# Altium PCB Motor Connection V1.PcbDoc
Units mm, origin at the board's own origin, x right, y up, seen from the top; angles counter-clockwise.
Board outline 33.5 x 13.5 mm, 4 copper layers (Top, Route2, Route15, Bottom), stack 1.78 mm thick; 10 components, 20 nets, 68 pads, 34 vias.
Unrouted connection lines stored in the file: 18.
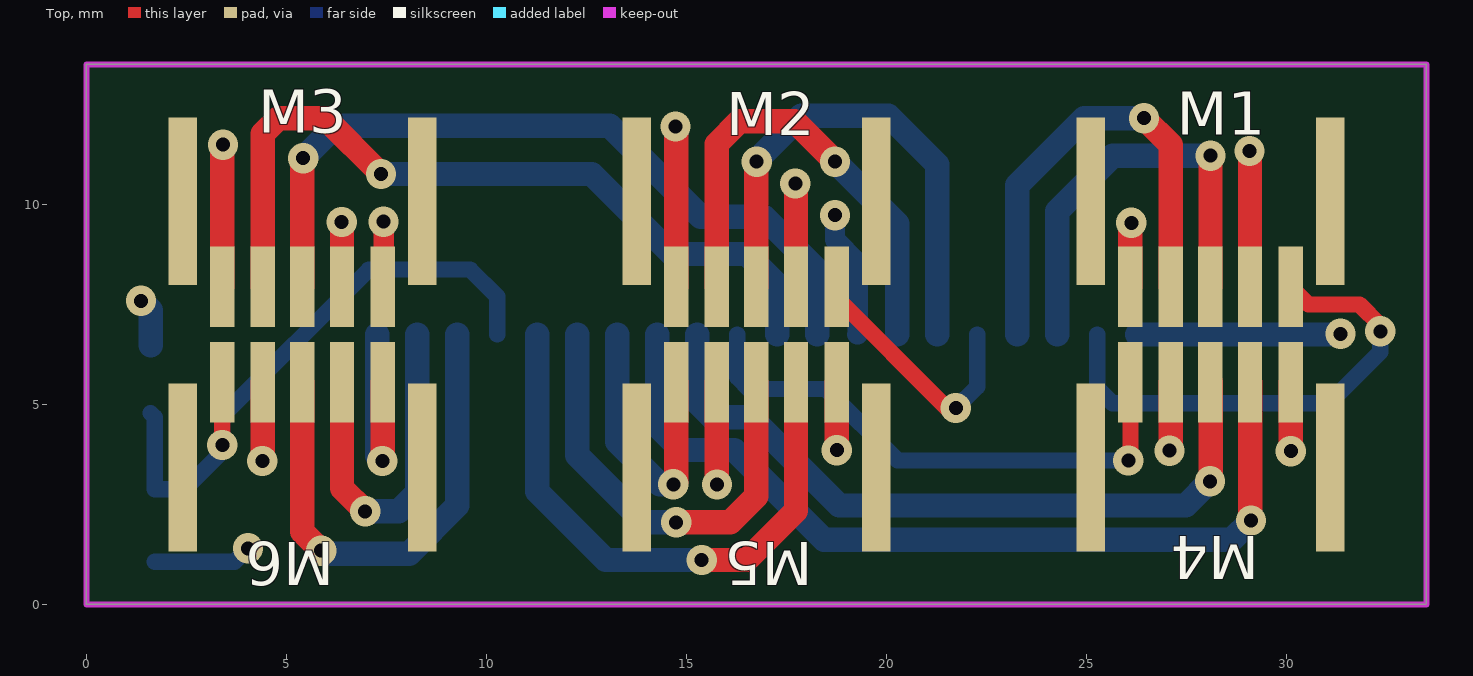
[diagram p0: Top view]
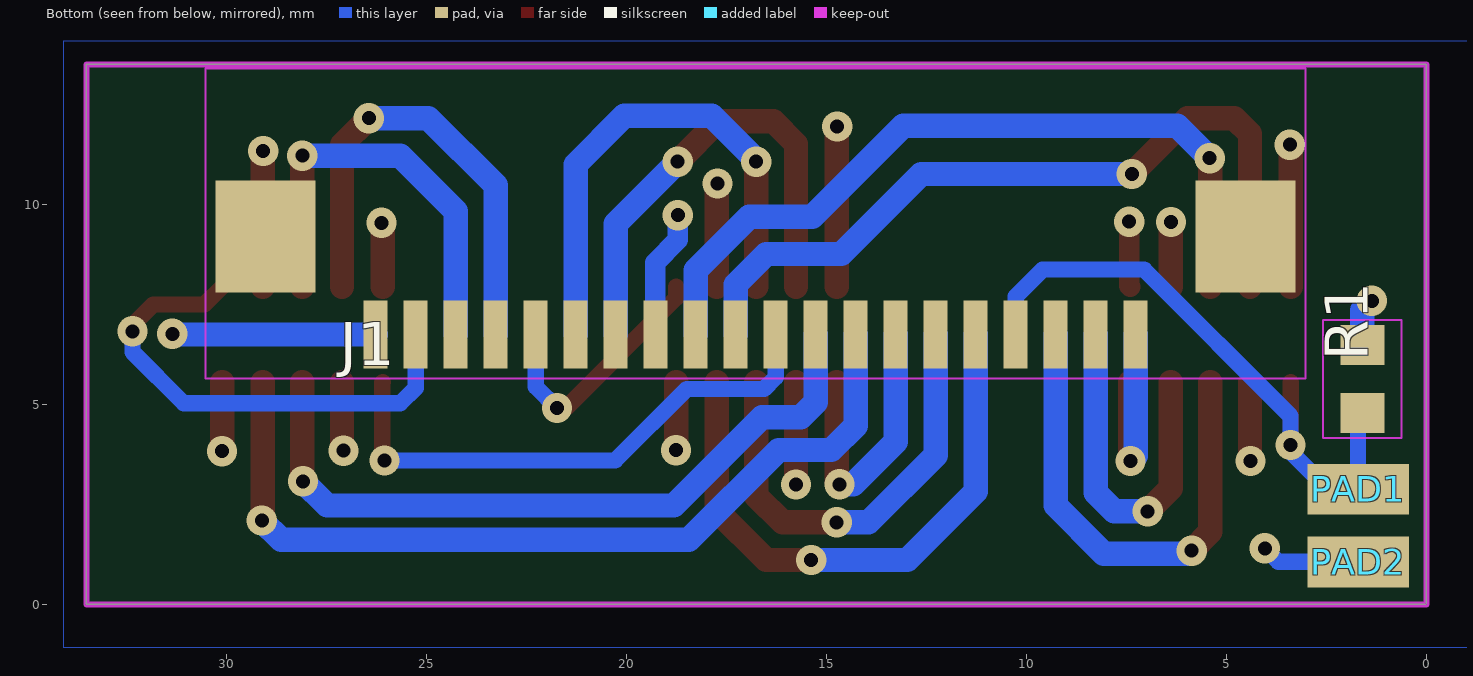
[diagram p1: Bottom view, seen from below]
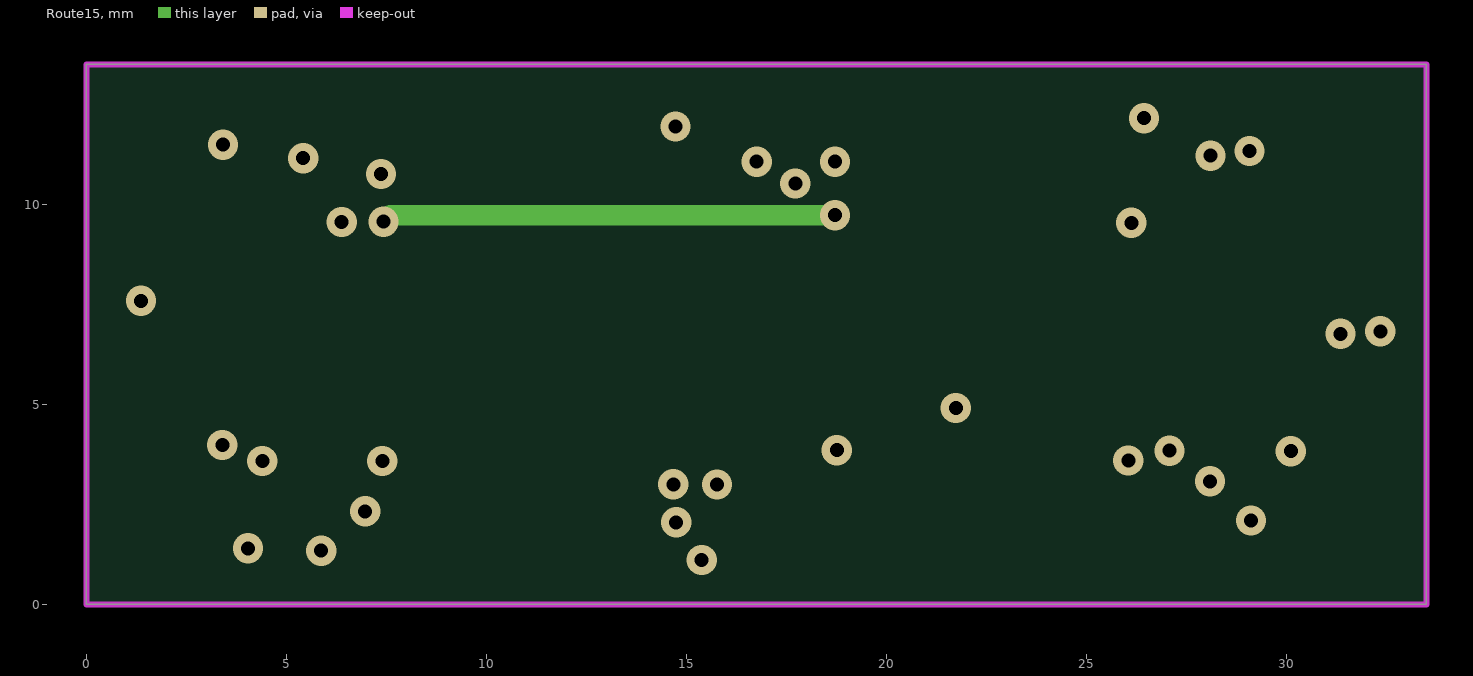
[diagram p2: Route15]

## Layer stack, top to bottom
Top Solder: solder mask 0.0102, Solder Resist, Dk 3.5
Top: signal copper 0.035
Dielectric 1: dielectric 0.32, FR-4, Dk 4.8
Route2: signal copper 0.035
Dielectric 3: core 1, FR-4, Dk 4.8
Route15: signal copper 0.035
Dielectric2: dielectric 0.32, FR-4, Dk 4.8
Bottom: signal copper 0.035
Bottom Solder: solder mask 0.0102, Solder Resist, Dk 3.5

## Board outline
0,13.5 0,0 33.5,0 33.5,13.5

## Design rules (kind name [scope] priority, off if disabled: settings)
BoardOutlineClearance mdCopperDimension [All] p1: gap=0.254 ignorepadtopadclearanceinfootprint=FALSE except(0: Arc-SplitContinuation Track-SplitContinuation SMDPad-SplitContinuation THPad-SplitContinuation Via-SplitContinuation Fill-SplitContinuation Poly-SplitContinuation Region-SplitContinuation Text-SplitContinuation; 0.3: Poly-OutlineEdge Poly-CavityEdge Poly-CutoutEdge Poly-SplitBarrior)
Clearance "Clearance (Same Net)" [All] p1: gap=0.152 ignorepadtopadclearanceinfootprint=FALSE
Clearance [All] p2: gap=0.152 ignorepadtopadclearanceinfootprint=FALSE
HoleSize [All] p1: absolutevalues=TRUE maxlimit=2540 minlimit=0.35 maxpercent=80.000 minpercent=20.000
HoleToHoleClearance mdDrill [All] p1: gap=0.152 allowstackedmicrovias=TRUE
MinimumSolderMaskSliver [All] p1 off: minsoldermaskwidth=0.254
PasteMaskExpansion mlMinCreamFrame [All] p1: expansion=0
PolygonConnect PolygonConnect_For_PolygonThermal_ON_Width59100_Gap100000 [InPolygonClass('PolygonThermal_ON_Width59100_Gap100000') vs Not IsVia] p1: connectstyle=Relief reliefconductorwidth=0.15 reliefentries=4 polygonreliefangle="90 Angle" airgapwidth=0.254
PolygonConnect ThermalVias [IsVia] p2: connectstyle=Direct reliefconductorwidth=0.254 reliefentries=4 polygonreliefangle="90 Angle" airgapwidth=0.254
PolygonConnect [All] p3: connectstyle=Relief reliefconductorwidth=0.254 reliefentries=4 polygonreliefangle="90 Angle" airgapwidth=0.254
RoutingVias [All] p1: holewidth=0.35 width=0.756 viastyle="Through Hole" minholewidth=0.35 minwidth=0.756 maxholewidth=2.54 maxwidth=2.54
SolderMaskExpansion mlMinStopFrame [All] p1: expansion=0.102 istentingtop=FALSE
Width [All] p1: maxlimit=0.254 minlimit=0.152 preferedwidth=0.152
26 further rules are at their usual default settings.

## Classes and differential pairs
polygon class PolygonThermal_ON_Width59100_Gap100000: Polygon_1_Net_GND Polygon_1_Net_VCC Polygon_2_Net_GND Polygon_3_Net_GND

## Components (designator, comment, footprint, x,y, rotation, side; value= is the part's Value field where it differs from the comment)
J1 "" GCT_FFC3B07-20-T 16.77,9.197 r0 bottom
M1 "" FCI_SFW5R-1STE1LF 28.1,5.2 r0 top
M2 "" FCI_SFW5R-1STE1LF 16.75,5.2 r0 top
M3 "" FCI_SFW5R-1STE1LF 5.4,5.2 r0 top
M4 "" FCI_SFW5R-1STE1LF 28.1,8.3 r180 top
M5 "" FCI_SFW5R-1STE1LF 16.75,8.3 r180 top
M6 "" FCI_SFW5R-1STE1LF 5.4,8.3 r180 top
PAD1 "" SMD1,27-2,54 1.708,2.88 r270 bottom
PAD2 "" SMD1,27-2,54 1.709,1.064 r270 bottom
R1 "" R0603 1.604,5.633 r90 bottom

## Footprints (in the part's own frame and the unit in brackets; to place one, negate y for a bottom-side part, rotate by r counter-clockwise, add the part's x,y. Pads: shape width x height; smd on the part's side, far side on the other; paste and mask are expansions set on the pad)
FCI_SFW5R-1STE1LF [mil] "FCI_SFW5R-1STE1LF"
  rect 24x79 smd: 1(79,108) 2(39,108) 3(0,108) 4(-39,108) 5(-79,108)
  rect 28x165 smd: 6(-118,192) 7(118,192)
  body extent -215,55 215,329, height 150
GCT_FFC3B07-20-T [mm] "GCT_FFC3B07-20-T"
  rect 0.6x1.7 smd: 1(9.5,2.45) 2(8.5,2.45) 3(7.5,2.45) 4(6.5,2.45) 5(5.5,2.45) 6(4.5,2.45) 7(3.5,2.45) 8(2.5,2.45) 9(1.5,2.45) 10(0.5,2.45) 11(-0.5,2.45) 12(-1.5,2.45) 13(-2.5,2.45) 14(-3.5,2.45) 15(-4.5,2.45) 16(-5.5,2.45) 17(-6.5,2.45) 18(-7.5,2.45) 19(-8.5,2.45) 20(-9.5,2.45)
  rect 2.5x2.8 smd: S1(12.25,0) S2(-12.25,0)
  Top keep-out lines w0.05: -13.75,3.55 13.75,3.55 13.75,-4.2 -13.75,-4.2 -13.75,3.55
  body extent -13.78,-4.23 13.78,3.58, height 3.81
R0603 [mm] "R0603"
  rect 1x1.1 smd: 1(-0.85,0) 2(0.85,0)
  Top keep-out lines w0.051: -1.473,-0.983 -1.473,0.983 1.473,0.983 1.473,-0.983 -1.473,-0.983
  body extent -1.5,-1.01 1.5,1.01, height 3.81
SMD1,27-2,54 [mm] "SMD1,27-2,54"
  rect 1.27x2.54 smd: 1(0,0)
  body extent -0.63,-1.27 0.64,1.27, height 1.27

## Part data
J1: library part GCT_FFC3B07-20-T, PackageName=GCT_FFC3B07-20-T
M1 M2 M3 M4 M5 M6: library part FCI_SFW5R-1STE1LF, PackageName=FCI_SFW5R-1STE1LF
PAD1 PAD2: library part SMD1,27-2,54, PackageName=SMD1,27-2,54
R1: library part R0603, PackageName=R0603

## Via types
v1: diameter 0.756/0.756/0.756/0.756 (per signal layer), hole 0.35, Top to Bottom, 34 vias

## Nets (pads, with @x,y where several pads share a name; then routed paths per layer and width w, separated by ;. In a path a pad name is that pad's centre, name@x,y a point inside that pad or via, vN(x,y) a via of type N, cw(c..) or ccw(c..) an arc to the next point about the centre after c; other vN are vias at no path point)
A1_M1: J1.3 M1.3 | length 10.8
  Top w0.61: M1.3 28.102,7.945 v1(28.102,11.218)
  Bottom w0.61: J1.3 24.27,9.829 25.659,11.218 v1(28.102,11.218)
A1_M3: J1.9 M3.3 | length 19.5
  Top w0.61: M3.3 5.4,11.137 v1(5.419,11.156)
  Bottom w0.61: v1(5.419,11.156) 6.234,11.971 13.082,11.971 15.358,9.695 16.931,9.695 18.27,8.356 J1.9
A1_M5: J1.15 M5.3 | length 11.3
  Top w0.61: v1(14.745,2.053) 16.094,2.053 16.75,2.709 M5.3
  Bottom w0.61: J1.15 12.27,3.732 13.949,2.053 v1(14.745,2.053)
A2_M1: J1.4 M1.4 | length 12.1
  Top w0.61: v1(26.44,12.157) 27.109,11.487 M1.4
  Bottom w0.61: J1.4@23.27,6.747 23.27,10.477 24.95,12.157 v1(26.44,12.157)
A2_M3: J1.10 M3.4 | length 19.8
  Top w0.61: M3.4 4.409,11.762 4.801,12.154 5.972,12.154 v1(7.364,10.762)
  Bottom w0.61: v1(7.364,10.762) 12.629,10.762 14.63,8.761 16.507,8.761 17.27,7.998 J1.10
A2_M5: J1.16 M5.4 | length 14.8
  Top w0.61: v1(15.381,1.112) 16.506,1.112 17.741,2.346 M5.4
  Bottom w0.61: J1.16 11.27,2.824 12.983,1.112 v1(15.381,1.112)
B1_M2: J1.6 M2.3 | length 12.9
  Top w0.61: M2.3 16.75,11.061 v1(16.757,11.068)
  Bottom w0.61: v1(16.757,11.068) 16.757,11.104 17.867,12.214 20.053,12.214 21.27,10.997 J1.6
B1_M4: J1.12 M4.3 | length 18.3
  Top w0.61: v1(28.088,3.079) 28.107,3.098 28.107,5.55 M4.3
  Bottom w0.61: J1.12 15.27,5.056 15.645,4.681 16.611,4.681 18.82,2.472 27.481,2.472 v1(28.088,3.079)
B1_M6: J1.18 M6.3 | length 12.6
  Top w0.61: M6.3 5.4,1.812 v1(5.869,1.343)
  Bottom w0.61: v1(5.869,1.343) 5.942,1.27 8.066,1.27 9.27,2.474 J1.18
B2_M2: J1.7 M2.4 | length 12.1
  Top w0.61: M2.4 15.759,11.511 16.324,12.075 17.71,12.075 v1(18.717,11.068)
  Bottom w0.61: v1(18.717,11.068) 20.27,9.515 J1.7
B2_M4: J1.13 M4.4 | length 22
  Top w0.61: M4.4 29.093,5.554 29.093,2.117 v1(29.114,2.096)
  Bottom w0.61: J1.13 14.27,4.465 14.875,3.86 16.193,3.86 18.439,1.614 28.632,1.614 v1(29.114,2.096)
B2_M6: J1.19 M6.4 | length 8.9
  Top w0.61: M6.4 6.391,2.904 v1(6.968,2.327)
  Bottom w0.61: v1(6.968,2.327) 7.805,2.327 8.27,2.792 J1.19
GND: J1.20 J1.S1 J1.S2 M1.5 M2.5 M3.5 M4.5 M5.5 M6.5 PAD2.1 | length 20.3
  Top w0.61: M3.5 3.393,11.492 v1(3.414,11.492) ; v1(7.398,3.584) 7.407,3.593 M6.5 ; v1(14.73,11.947) 14.743,11.934 M2.5 ; M5.5 18.757,3.859 v1(18.761,3.855) ; M1.5 26.093,9.512 v1(26.122,9.541) ; M4.5 30.107,3.835 v1(30.111,3.831)
  Bottom w0.406: PAD2.1 3.702,1.064 v1(4.04,1.402)
  Bottom w0.61: J1.20 7.27,3.712 v1(7.398,3.584)
MOTOR1_SENSE: J1.2 M1.1 | length 12.4
  Top w0.406: M1.1 30.55,7.5 31.827,7.5 32.349,6.979 v1(32.349,6.829)
  Bottom w0.406: J1.2 25.27,5.41 25.653,5.027 31.064,5.027 32.349,6.312 v1(32.349,6.829)
MOTOR2_SENSE: J1.5 M2.1 | length 6.5
  Top w0.406: M2.1 18.757,7.663 21.51,4.91 v1(21.735,4.91)
  Bottom w0.406: v1(21.735,4.91) 22.27,5.445 J1.5
MOTOR3_SENSE: J1.8 M3.1 | length 16.2
  Top w0.508: M3.1 7.43,7.967 v1(7.43,9.57)
  Route15 w0.508: v1(7.43,9.57) 7.59,9.73 v1(18.715,9.73)
  Bottom w0.508: v1(18.715,9.73) 18.715,9.111 19.28,8.545 19.28,6.757 J1.8
MOTOR4_SENSE: J1.11 M4.1 | length 13.7
  Top w0.406: v1(26.047,3.601) 26.102,3.656 26.102,5.548 M4.1
  Bottom w0.406: J1.11 16.27,5.678 16.561,5.387 18.491,5.387 20.277,3.601 v1(26.047,3.601)
MOTOR5_SENSE: J1.14 M5.1 | length 7.1
  Top w0.61: v1(14.672,3.002) 14.743,3.073 M5.1
  Bottom w0.61: J1.14 13.27,4.064 14.332,3.002 v1(14.672,3.002)
MOTOR6_SENSE: J1.17 M6.1 PAD1.1 R1.1 | length 16.1
  Top w0.406: M6.1 3.393,3.992 v1(3.397,3.988)
  Bottom w0.406: R1.1 1.708,4.679 PAD1.1 2.459,2.88 3.412,3.833 3.412,3.973 v1(3.397,3.988) 3.397,4.71 7.057,8.37 9.597,8.37 10.27,7.697 J1.17
VCC: J1.1 M1.2 M2.2 M3.2 M4.2 M5.2 M6.2 R1.2 | length 20.2
  Top w0.61: v1(4.397,3.584) 4.409,3.596 M6.2 ; v1(6.383,9.559) 6.391,9.551 M3.2 ; M5.2 15.759,3.003 v1(15.763,2.999) ; v1(17.723,10.525) 17.741,10.507 M2.2 ; v1(27.076,3.845) 27.109,3.878 M4.2 ; v1(29.08,11.334) 29.091,11.323 M1.2
  Bottom w0.61: v1(1.367,7.591) 1.604,7.353 R1.2 ; J1.1@26.27,6.747 31.333,6.747 v1(31.352,6.766)
pads on no net: M1.6 M1.7 M2.6 M2.7 M3.6 M3.7 M4.6 M4.7 M5.6 M5.7 M6.6 M6.7

## Polygon pours and split planes (outlines as drawn)
GND on Route2 "Polygon_1_Net_GND" (solid, remove dead copper, pour order 2): -3.075,16.075 36.075,16.075 36.075,-3.075 -3.075,-3.075
GND on Top "Polygon_2_Net_GND" (solid, remove dead copper, shelved, pour order 3): -4.075,17.075 37.075,17.075 37.075,-4.075 -4.075,-4.075
GND on Bottom "Polygon_3_Net_GND" (solid, remove dead copper, shelved, pour order 0): -1.075,14.075 34.075,14.075 34.075,-1.075 -1.075,-1.075
VCC on Route15 "Polygon_1_Net_VCC" (solid, remove dead copper, pour order 1): -2.075,15.075 -2.075,-2.075 35.075,-2.075 35.075,15.075

## Keep-outs
Keep-Out Layer:
  the board outline again, w0.152

## Silkscreen, mask and mechanical layers (free items; w line width, h text height)
Dimension:
  the board outline again, w0.152
tDocu:
  circle w0.01: c-10.625,10.176 r1.8
  circle w0.01: c-3.5,14.29 r1.8
  circle w0.01: c3.5,14.29 r1.8
  circle w0.01: c10.625,10.176 r1.8
  circle w0.01: c14.125,4.114 r1.8
  circle w0.01: c14.125,-4.114 r1.8
  circle w0.01: c10.625,-10.176 r1.8
  circle w0.01: c3.5,-14.29 r1.8
  circle w0.01: c-3.5,-14.29 r1.8
  circle w0.01: c-10.625,-10.176 r1.8
  circle w0.01: c-14.125,4.114 r1.8
  circle w0.01: c-14.125,-4.114 r1.8
  lines w0.01: -17.54,-3.199 -13.21,-0.699 -10.71,-5.029 -15.04,-7.529 -17.54,-3.199 ; -17.54,3.199 -15.04,7.529 -10.71,5.029 -13.21,0.699 -17.54,3.199 ; -14.04,-9.261 -11.54,-13.591 -7.21,-11.091 -9.71,-6.761 -14.04,-9.261 ; -14.04,9.261 -11.54,13.591 -7.21,11.091 -9.71,6.761 -14.04,9.261 ; -6,-16.789 -6,-11.789 -1,-11.789 -1,-16.789 -6,-16.789 ; -6,11.789 -6,16.789 -1,16.789 -1,11.789 -6,11.789 ; 1,-16.789 6,-16.789 6,-11.789 1,-11.789 1,-16.789 ; 1,11.789 6,11.789 6,16.789 1,16.789 1,11.789 ; 7.21,-11.091 9.71,-6.761 14.04,-9.261 11.54,-13.591 7.21,-11.091 ; 7.21,11.091 11.54,13.591 14.04,9.261 9.71,6.761 7.21,11.091 ; 10.71,-5.029 13.21,-0.699 17.54,-3.199 15.04,-7.529 10.71,-5.029 ; 10.71,5.029 13.21,0.699 17.54,3.199 15.04,7.529 10.71,5.029
bPlace:
  text "M6_sens" at 10.314,2.799 h1.08
  text "Gnd" at 6.106,0.632 h1.08